# Altium PCB board.PcbDoc
Units mm, origin at the board's own origin, x right, y up, seen from the top; angles counter-clockwise.
Board outline 114.5 x 62 mm, 2 copper layers (Top Layer, Bottom Layer), stack 0.97 mm thick; 28 components, 27 nets, 85 pads, 0 vias.
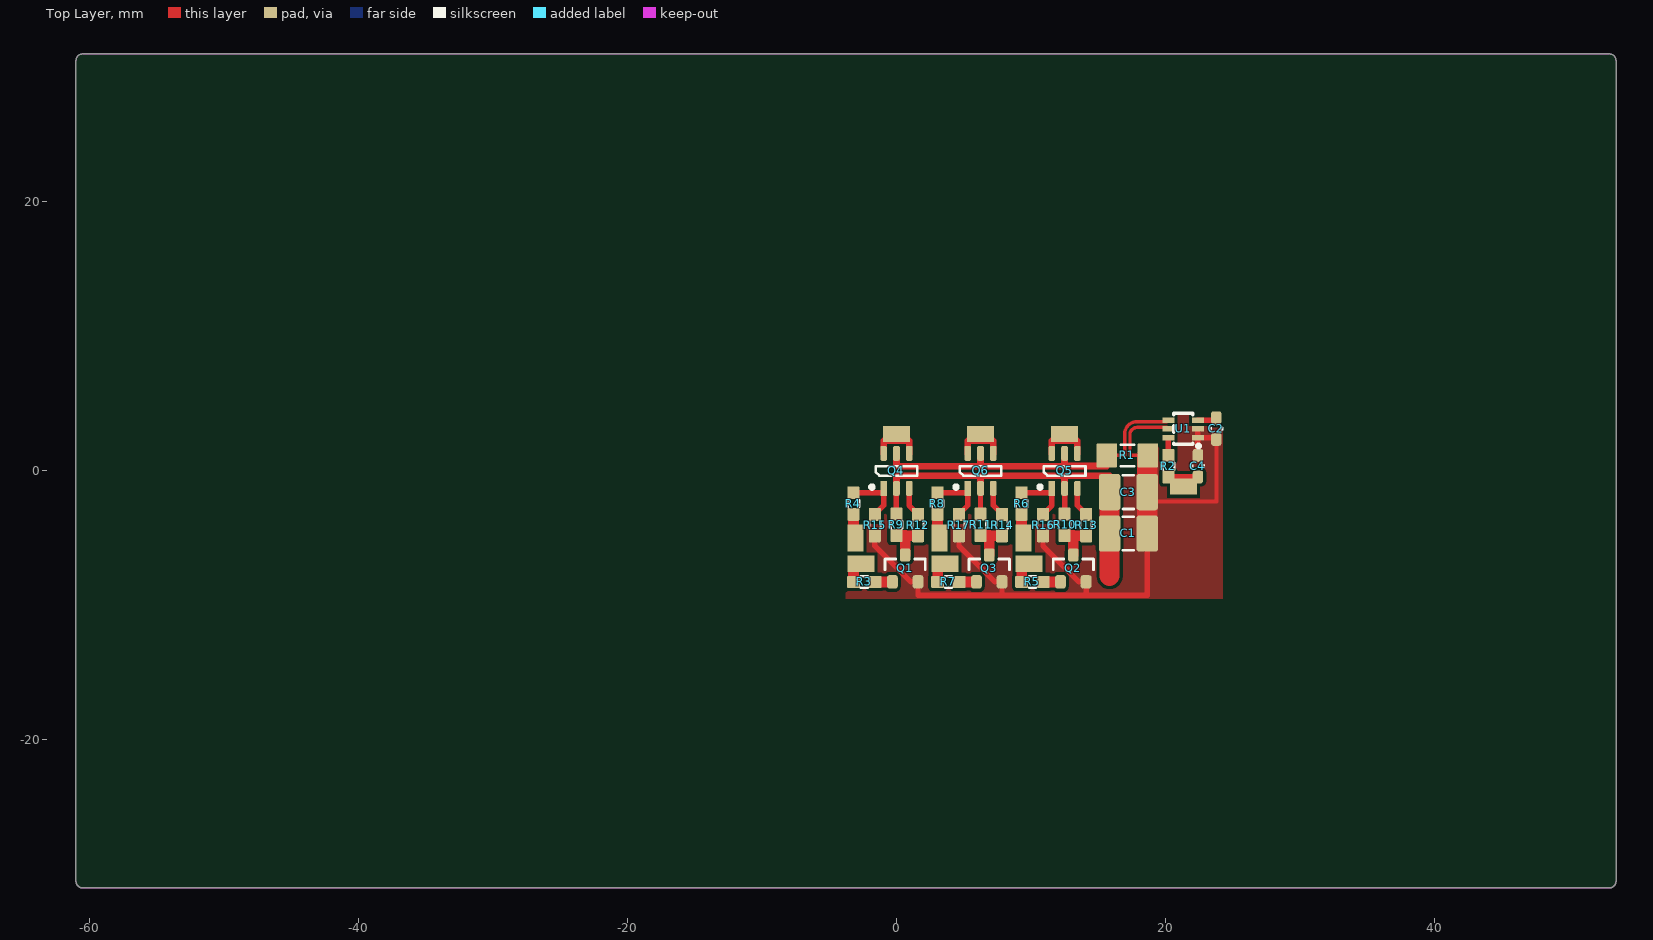
[diagram p0: Top Layer view]
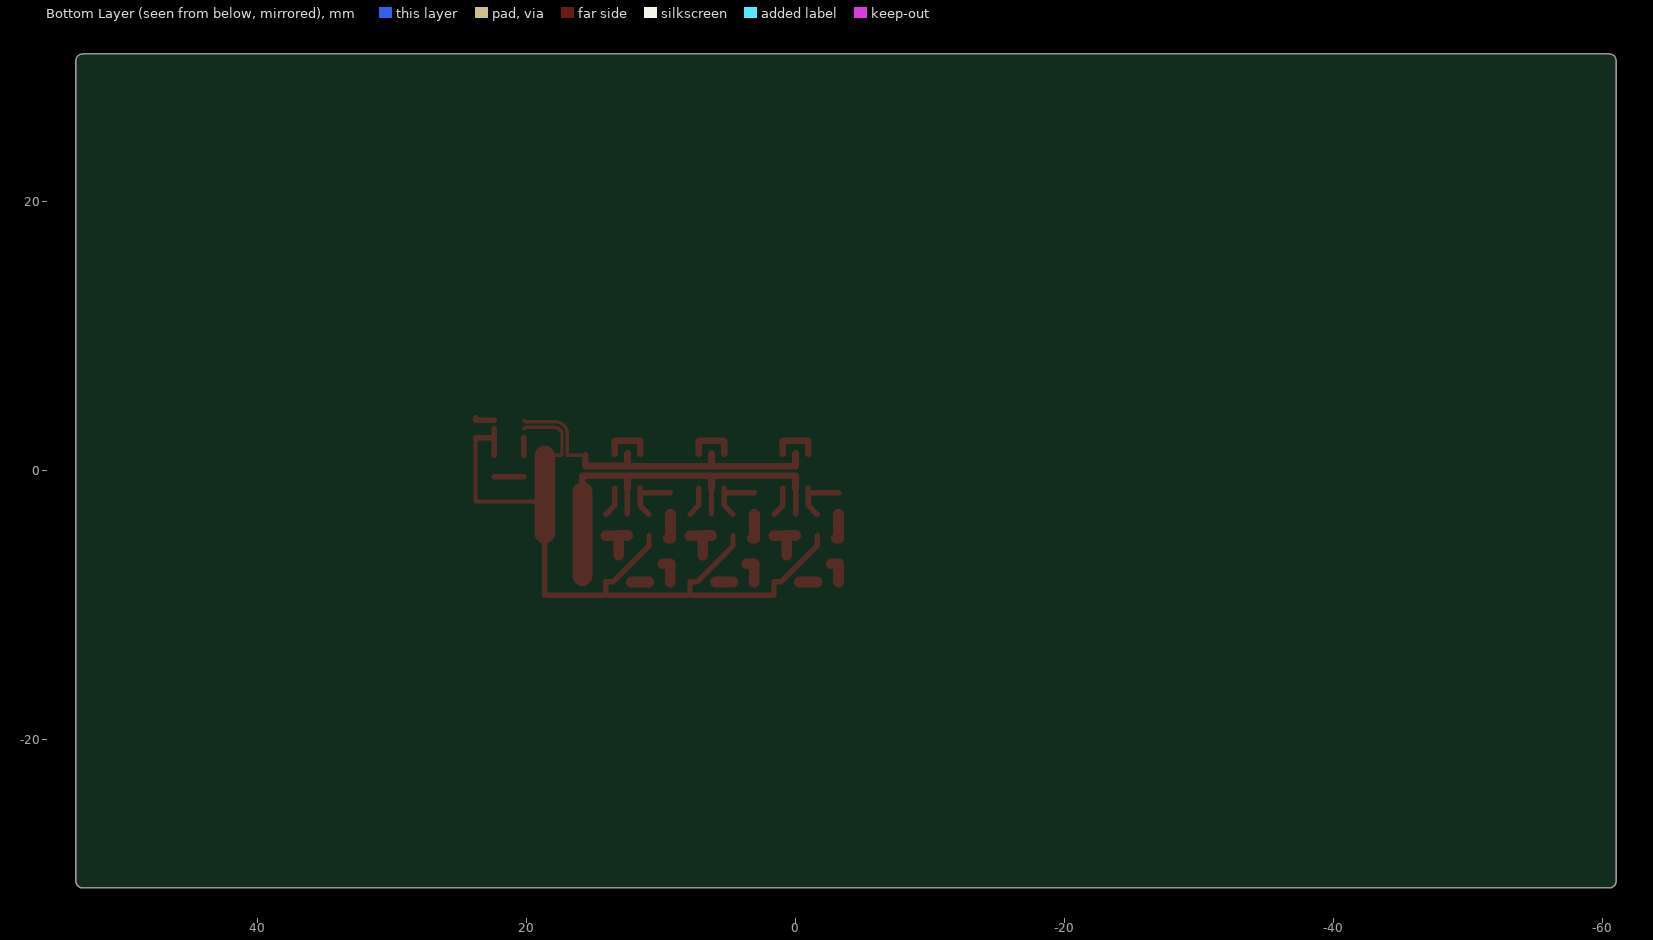
[diagram p1: Bottom Layer view, seen from below]
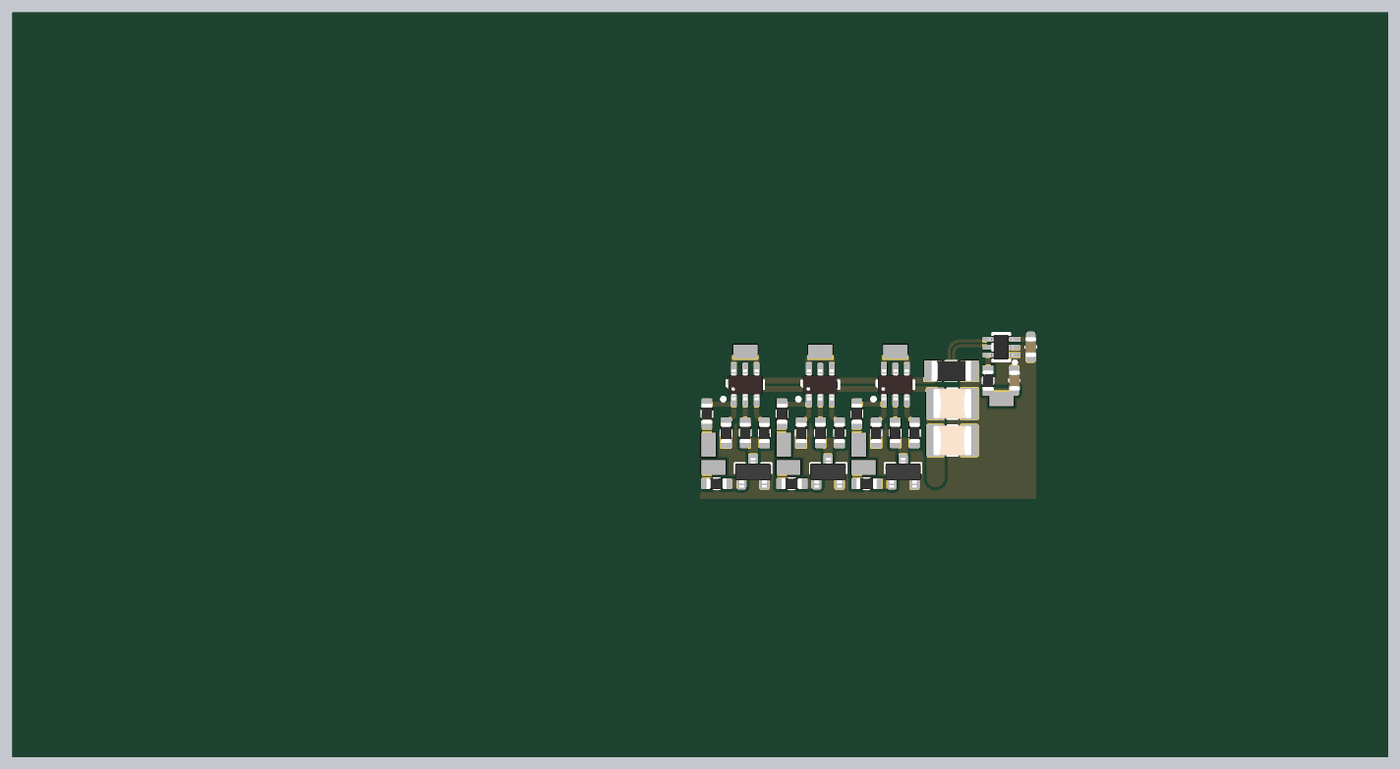
[diagram p2: 3D render of the assembled board from above, using the file's embedded part models]

## Layer stack, top to bottom
Top Solder: solder mask 0.0127, Solder Resist, Dk 3.8
Top Layer: signal copper 0.035
Dielectric: core 0.9, FR-4, Dk 4.5
Bottom Layer: signal copper 0.035
Bottom Solder: solder mask 0.0127, Solder Resist, Dk 3.8

## Board outline
-61,-30.5 ccw(c-60.5,-30.5) -60.5,-31 53,-31 ccw(c53,-30.5) 53.5,-30.5 53.5,30.5 ccw(c53,30.5) 53,31 -60.5,31 ccw(c-60.5,30.5) -61,30.5

## Design rules (kind name [scope] priority, off if disabled: settings)
AcuteAngle [All] p1: minimum=6.00000000000000E+0001 checktracksonly=FALSE
BoardOutlineClearance [All] p1: gap=0.3 ignorepadtopadclearanceinfootprint=FALSE
Clearance Clearance_1 [All] p1: gap=0.25 ignorepadtopadclearanceinfootprint=FALSE except(0.13: Arc-Arc Arc-Track Arc-SMDPad Arc-Via Track-Track Track-SMDPad Track-Via SMDPad-SMDPad SMDPad-Via THPad-Via Via-Via; 0.15: Arc-THPad Arc-Text Arc-Hole Track-THPad Track-Text Track-Hole SMDPad-THPad SMDPad-Text SMDPad-Hole THPad-THPad THPad-Text THPad-Hole Via-Text Via-Hole Fill-Text Fill-Hole Poly-Text Poly-Hole Region-Text Region-Hole Text-Text Text-Hole)
ComponentClearance ComponentClearance_1 [IsFree] p1: gap=-1 collisioncheckmode=3 verticalgap=2540 showdistances=FALSE
ComponentClearance [All] p2: gap=0.3 collisioncheckmode=3 verticalgap=0.254 showdistances=FALSE
Height [All] p1: minheight=0 maxheight=500 prefheight=12.7
HoleSize [All] p1: absolutevalues=TRUE maxlimit=6 minlimit=0.2 maxpercent=80.000 minpercent=20.000
HoleToHoleClearance HoleToHoleClearance_1 [IsVia vs IsThruPin] p1: gap=0.7 allowstackedmicrovias=TRUE
HoleToHoleClearance [All] p2: gap=0.5 allowstackedmicrovias=TRUE
MinimumSolderMaskSliver [All] p1 off: minsoldermaskwidth=0.254
PlaneClearance [All] p1: clearance=0.45
PlaneConnect [All] p1: planeconnectstyle=Direct reliefexpansion=0.3 reliefentries=4 reliefconductorwidth=0.381 reliefairgap=0.178
PolygonConnect [All] p1: connectstyle=Direct reliefconductorwidth=0.381 reliefentries=4 polygonreliefangle="90 Angle" airgapwidth=0.356
RoutingVias [All] p1: holewidth=0.3 width=0.6 viastyle="Through Hole" minholewidth=0.2 minwidth=0.45 maxholewidth=0.9 maxwidth=1.27
SilkToSilkClearance [All] p1 off: silktosilkclearance=0.254
SilkToSolderMaskClearance [IsPad] p1 off: minsilkscreentomaskgap=0.254 clearancetoexposedcopper=TRUE
SolderMaskExpansion [All] p1: expansion=0.102 istentingtop=FALSE
SupplyNets "Schematic Supply Nets_8" [InNet('GND_FET')] p1: voltage=0.000
SupplyNets "Schematic Supply Nets_7" [InNet('Vr')] p2: voltage=0.000
SupplyNets "Schematic Supply Nets_2" [InNet('3V3')] p3: voltage=0.000
SupplyNets "Schematic Supply Nets_1" [InNet('GND')] p4: voltage=0.000
UnRoutedNet [All] p1: checkbadconnections=TRUE
Width [All] p1: maxlimit=3.81 minlimit=0.14 preferedwidth=0.254
20 further rules are at their usual default settings.

## Classes and differential pairs
component class board: C1 C2 C3 C4 Q1 Q2 Q3 Q4 Q5 Q6 R1 R2 R3 R4 R5 R6 R7 R8 R9 R10 R11 U1

## Components (designator, comment, footprint, x,y, rotation, side; value= is the part's Value field where it differs from the comment)
C1 "4n7" C1210-2.5MM 17.25,-4.652 r0 top
C2 "1uF" C0603 23.778,3.15 r90 top
C3 "4n7" C1210-2.5MM 17.25,-1.575 r0 top
C4 "1uF" C0603 22.414,0.352 r270 top
Q1 "MMBT2222" SOT-23 0.65,-7.25 r270 top
Q2 "MMBT2222" SOT-23 13.15,-7.25 r270 top
Q3 "MMBT2222" SOT-23 6.9,-7.25 r270 top
Q4 "AP8G02LI" SOT-23-6 0,0 r0 top
Q5 "AP8G02LI" SOT-23-6 12.5,0 r0 top
Q6 "AP8G02LI" SOT-23-6 6.25,0 r0 top
R1 "0.010" R1206 17.164,1.152 r180 top
R2 "100" R0603 20.214,0.352 r270 top
R3 "100" R0603 -2.388,-8.25 r0 top
R4 "100" R0603 -3.2,-2.424 r90 top
R5 "100" R0603 10.112,-8.25 r0 top
R6 "100" R0603 9.3,-2.424 r90 top
R7 "100" R0603 3.862,-8.25 r0 top
R8 "100" R0603 3.05,-2.424 r90 top
R9 "100" R0603 0,-4 r90 top
R10 "100" R0603 12.5,-4 r90 top
R11 "100" R0603 6.25,-4 r90 top
R12 "100" R0603 1.6,-4.024 r90 top
R13 "100" R0603 14.1,-4.024 r90 top
R14 "100" R0603 7.85,-4.024 r90 top
R15 "18k" R0603 -1.6,-4.024 r270 top
R16 "18k" R0603 10.9,-4.024 r270 top
R17 "18k" R0603 4.65,-4.024 r270 top
U1 "INA199A1" SC-70-6 21.314,3.124 r0 top

## Footprints (in the part's own frame and the unit in brackets; to place one, negate y for a bottom-side part, rotate by r counter-clockwise, add the part's x,y. Pads: shape width x height; smd on the part's side, far side on the other; paste and mask are expansions set on the pad)
C0603 [mil] "Chip Capacitor"
  rrect50% 38x31 smd mask+1.97: 1(-31.5,0) 2(31.5,0)
  silkscreen extent -3,-17 3,17, body extent -33,-18 33,18, height 35
C1210-2.5MM [mm] "Chip Capacitor"
  rrect25% 1.6x2.7 smd mask+0.05: 1(-1.4,0) 2(1.4,0)
  silkscreen extent -0.4,-1.25 0.4,1.25, body extent -1.6,-1.25 1.6,1.25, height 2.52
R0603 [mil] "Chip Resistor; Body 1.6 x 0.8 mm (LxW typ)"
  rrect20% 38x35.43 smd mask+1.97: 1(-31.5,0) 2(31.5,0)
  silkscreen extent -10,-17 10,17, body extent -33,-18 33,18, height 22
R1206 [mil] "Chip Resistor"
  rrect10% 60x70 smd mask+1.97: 1(-60,0) 2(60,0)
  silkscreen extent -20,-31 20,31, body extent -65,-33 65,33, height 26
SC-70-6 [mm]
  rect 0.9x0.4 smd paste+0 mask+0.051: 1(1.1,-0.65) 2(1.1,0) 3(1.1,0.65) 4(-1.1,0.65) 5(-1.1,0) 6(-1.1,-0.65)
  silkscreen extent -0.7,-1.4 1.27,1.15, body extent -1.05,-1 1.05,1, height 0.95
SOT-23 [mm]
  rrect50% 1x0.8 smd mask+0.05: 1(1,-0.95) 2(1,0.95) 3(-1,0)
  silkscreen extent -0.7,-1.5 0.1,1.5, body extent -1.27,-1.5 1.33,1.5, height 1.1
SOT-23-6 [mm]
  rect 0.5x1.1 smd mask+0.05: 1(-0.95,-1.3)
  rrect50% 0.5x1.1 smd mask+0.05: 2(0,-1.3) 3(0.95,-1.3) 4(0.95,1.3) 5(0,1.3) 6(-0.95,1.3)
  silkscreen extent -1.95,-1.32 1.55,0.35, body extent -1.45,-1.3 1.45,1.3, height 1.14

## Part data
C1 C3: library part CAP, "4n7 0402"
C2 C4: library part CAP, "1uF 0603"
Q1 Q2 Q3: library part MMBT2222ALT1G, LCSC part number=C82460, P/N=MMBT2222ALT1G
Q4 Q5 Q6: "MOSFET N-CH & P-CH", LCSC part number=C2589, P/N=IRLML2502TRPBF
R1 R2 R3 R4 R5 R6 R7 R8 R9 R10 R11 R12 R13 R14: library part RES, LCSC part number=C138044, P/N=RC0402FR-0718KL
R15 R16 R17: library part RES, "18k 0402", LCSC part number=C138044, P/N=RC0402FR-0718KL

## Free pads (board coordinates)
  rect 1.2x2 smd: 6(-3.048,-5) 6(3.202,-5) 6(9.452,-5)
  rect 2x1.2 smd: 6(-2.648,-6.898) 6(0,2.75) 6(3.602,-6.898) 6(6.25,2.75) 6(9.852,-6.898) 6(12.5,2.75) 6(21.339,-1.168)

## Nets (pads, with @x,y where several pads share a name; then routed paths per layer and width w, separated by ;. In a path a pad name is that pad's centre, name@x,y a point inside that pad or via, vN(x,y) a via of type N, cw(c..) or ccw(c..) an arc to the next point about the centre after c; other vN are vias at no path point)
3V3: C2.2 U1.3 | length 1.5
  Top Layer w0.4: U1.3 23.778,3.774 C2.2
GND: C1.2 C2.1 C3.2 C4.1 Q1.2 Q2.2 Q3.2 R1.1 R15.2 R16.2 R17.2 U1.1 U1.2 U1.5 | length 65.6
  Top Layer w0.25: R1.1 17.362,1.152 17.362,2.701 cw(c17.899,2.701) 17.899,3.238 20.1,3.238 U1.5
  Top Layer w0.3: C3.2 18.65,-2.261 23.778,-2.261 C2.1
  Top Layer w0.4: R15.2 -1.6,-5.567 1.083,-8.25 Q1.2 1.6,-9.25 7.85,-9.25 ; R17.2 4.65,-5.567 7.333,-8.25 Q3.2 7.85,-9.25 ; R16.2 10.9,-5.567 13.583,-8.25 Q2.2 14.1,-9.25 ; C1.2 18.65,-9.25 14.1,-9.25 ; R1.1@18.65,1.152 R1.1 ; C4.1 U1.1 ; U1.2 U1.1 ; C2.1 23.778,2.474 U1.1 ; 7.85,-9.25 14.1,-9.25
  Top Layer w1.5: C1.2 C3.2 R1.1@18.65,1.152
GND_FET: Q4.5 Q5.5 Q6.5 R1.2 U1.4 | length 26
  Top Layer w0.25: R1.2 16.972,1.152 16.972,2.751 cw(c17.881,2.751) 17.881,3.659 20.099,3.659 U1.4
  Top Layer w0.5: Q4.5 0,0.35 6.25,0.35 ; Q6.5 6.25,0.35 ; 12.5,0.35 6.25,0.35 ; Q5.5 12.5,0.361 15.64,0.361 R1.2
NetC4_2: C4.2 pad.6@21.339,-1.168 R2.2 | length 2.2
  Top Layer w0.4: R2.2 C4.2
NetQ1_1: Q1.1 R3.2 | length 1.3
  Top Layer w0.8: R3.2 Q1.1
NetQ1_3: Q1.3 R9.1 R12.1 | length 3
  Top Layer w0.8: R9.1 0.65,-4.8 ; Q1.3 0.65,-4.824 R12.1
NetQ2_1: Q2.1 R5.2 | length 1.3
  Top Layer w0.8: R5.2 Q2.1
NetQ2_3: Q2.3 R10.1 R13.1 | length 3
  Top Layer w0.8: R10.1 13.15,-4.8 ; Q2.3 13.15,-4.824 R13.1
NetQ3_1: Q3.1 R7.2 | length 1.3
  Top Layer w0.8: R7.2 Q3.1
NetQ3_3: Q3.3 R11.1 R14.1 | length 3
  Top Layer w0.8: R11.1 6.9,-4.8 ; Q3.3 6.9,-4.824 R14.1
NetQ4_1: Q4.1 R4.2 R15.1 | length 4.8
  Top Layer w0.4: R4.2 -0.95,-1.624 Q4.1 -0.95,-2.574 R15.1
NetQ4_3: Q4.3 R12.2 | length 2.2
  Top Layer w0.4: Q4.3 0.95,-2.574 R12.2
NetQ5_1: Q5.1 R6.2 R16.1 | length 4.8
  Top Layer w0.4: R6.2 11.55,-1.624 Q5.1 11.55,-2.574 R16.1
NetQ5_3: Q5.3 R13.2 | length 2.2
  Top Layer w0.4: Q5.3 13.45,-2.574 R13.2
NetQ6_1: Q6.1 R8.2 R17.1 | length 4.8
  Top Layer w0.4: R8.2 5.3,-1.624 Q6.1 5.3,-2.574 R17.1
NetQ6_3: Q6.3 R14.2 | length 2.2
  Top Layer w0.4: Q6.3 7.2,-2.574 R14.2
NetR2_1: R2.1 U1.6 | length 1.3
  Top Layer w0.4: R2.1 U1.6
PH_U: pad.6@0,2.75 Q4.4 Q4.6 | length 3.8
  Top Layer w0.5: Q4.6 -0.95,2.25 0.95,2.25 Q4.4
PH_V: pad.6@12.5,2.75 Q5.4 Q5.6 | length 3.8
  Top Layer w0.5: Q5.6 11.55,2.25 13.45,2.25 Q5.4
PH_W: pad.6@6.25,2.75 Q6.4 Q6.6 | length 3.8
  Top Layer w0.5: Q6.6 5.3,2.25 7.2,2.25 Q6.4
U_H: pad.6@-2.648,-6.898 R3.1 | length 1.9
  Top Layer w0.8: R3.1 -3.188,-6.898 pad.6@-2.648,-6.898
U_L: pad.6@-3.048,-5 R4.1 | length 1.9
  Top Layer w0.8: R4.1 -3.2,-5 pad.6@-3.048,-5
V_H: pad.6@9.852,-6.898 R5.1 | length 1.9
  Top Layer w0.8: R5.1 9.312,-6.898 pad.6@9.852,-6.898
V_L: pad.6@9.452,-5 R6.1 | length 1.9
  Top Layer w0.8: R6.1 9.3,-5 pad.6@9.452,-5
Vr: C1.1 C3.1 Q4.2 Q5.2 Q6.2 R9.2 R10.2 R11.2 | length 31.8
  Top Layer w0.4: R9.2 Q4.2 ; R11.2 Q6.2 ; R10.2 Q5.2
  Top Layer w0.5: Q4.2 0,-0.35 6.25,-0.35 ; Q6.2 6.25,-0.35 ; Q5.2 12.5,-0.35 ; C3.1@15.85,-1.55 15.85,-0.35 12.5,-0.35 ; 6.25,-0.35 12.5,-0.35
  Top Layer w1.5: 15.85,-7.798 C1.1 C3.1
W_H: pad.6@3.602,-6.898 R7.1 | length 1.9
  Top Layer w0.8: R7.1 3.062,-6.898 pad.6@3.602,-6.898
W_L: pad.6@3.202,-5 R8.1 | length 1.9
  Top Layer w0.8: R8.1 3.05,-5 pad.6@3.202,-5

## Polygon pours and split planes (outlines as drawn)
GND on Top Layer "GND_L01_P000" (solid, remove dead copper, pour order 0): 20.914,4.25 20.914,1.79 18.025,1.79 18.025,-0.25 -3.75,-0.25 -3.75,-9.5 24.25,-9.5 24.25,4.25

## Keep-outs
Keep-Out Layer:
  the board outline again, w0

## Silkscreen, mask and mechanical layers (free items; w line width, h text height)
Board Shape:
  the board outline again, w0